# Altium PCB PSU_main.PcbDoc
Units mm, origin at the board's own origin, x right, y up, seen from the top; angles counter-clockwise.
Board outline 79.38 x 98.86 mm, 2 copper layers (Top Layer, Bottom Layer); 37 components, 13 nets, 77 pads, 2 vias.
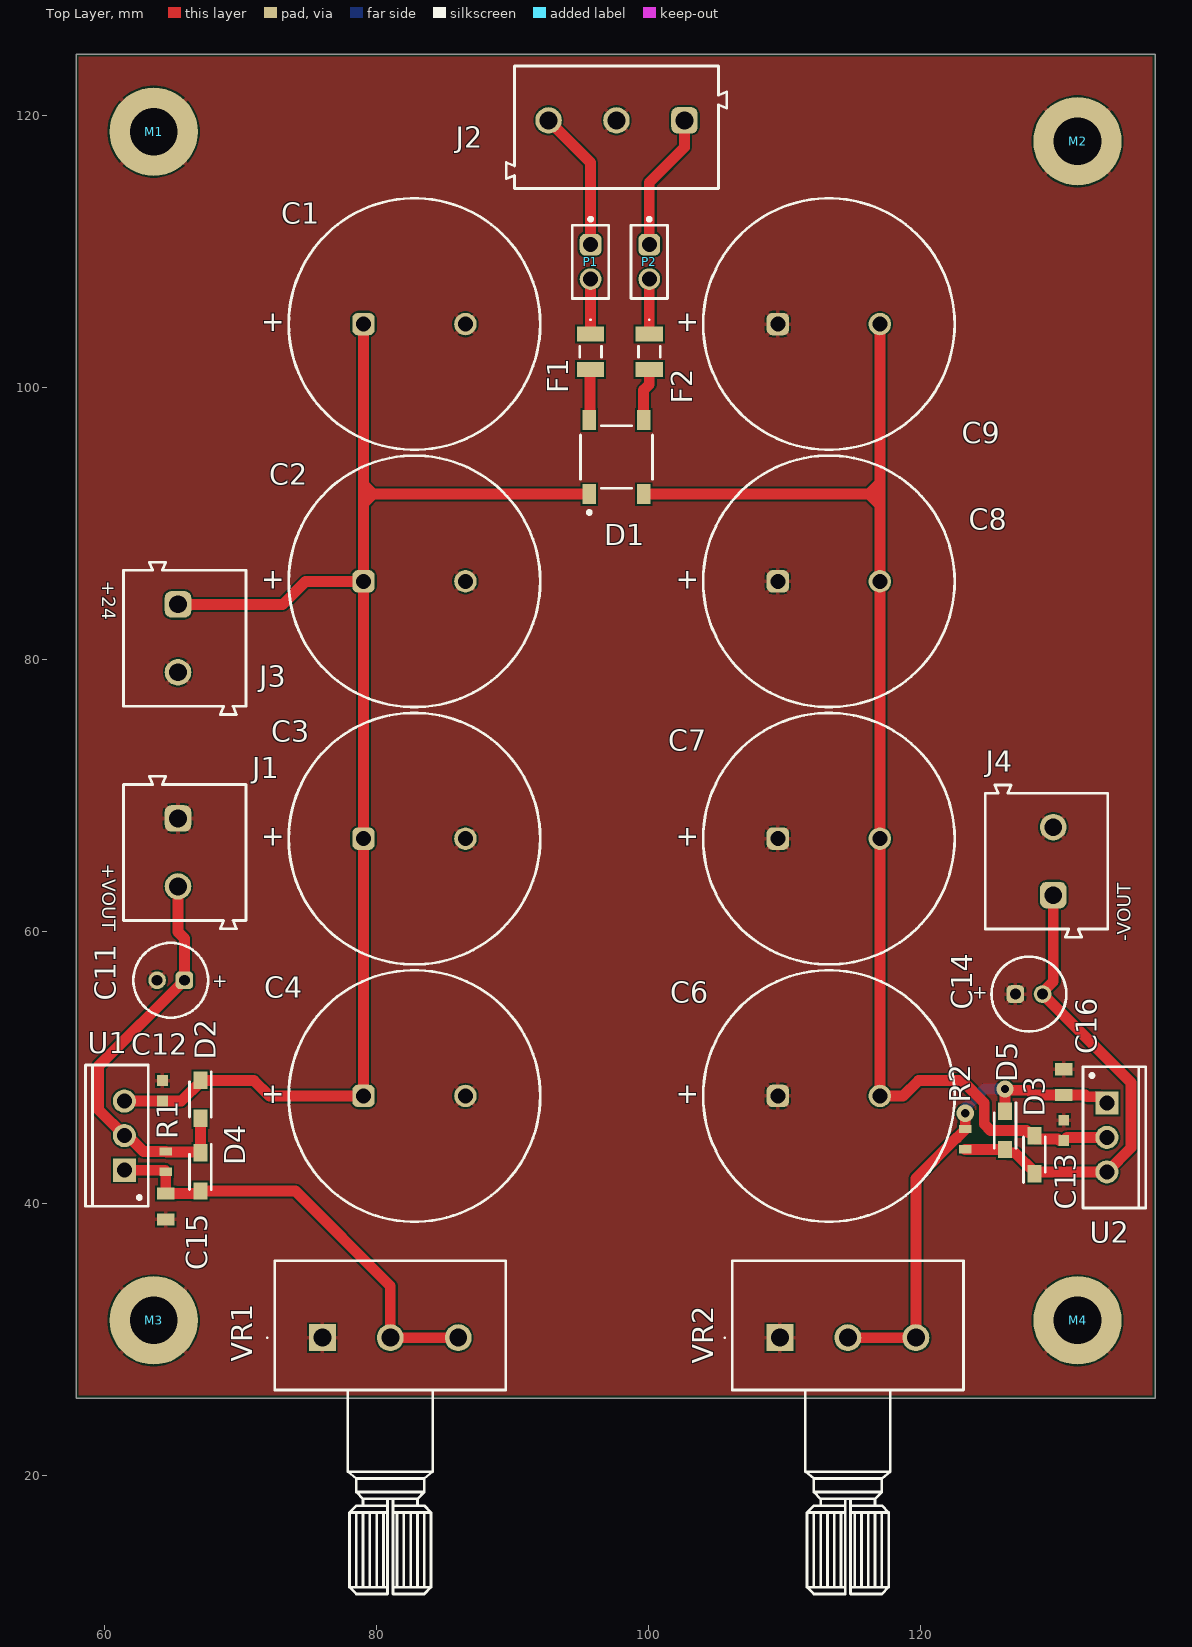
[diagram p0: Top Layer view]
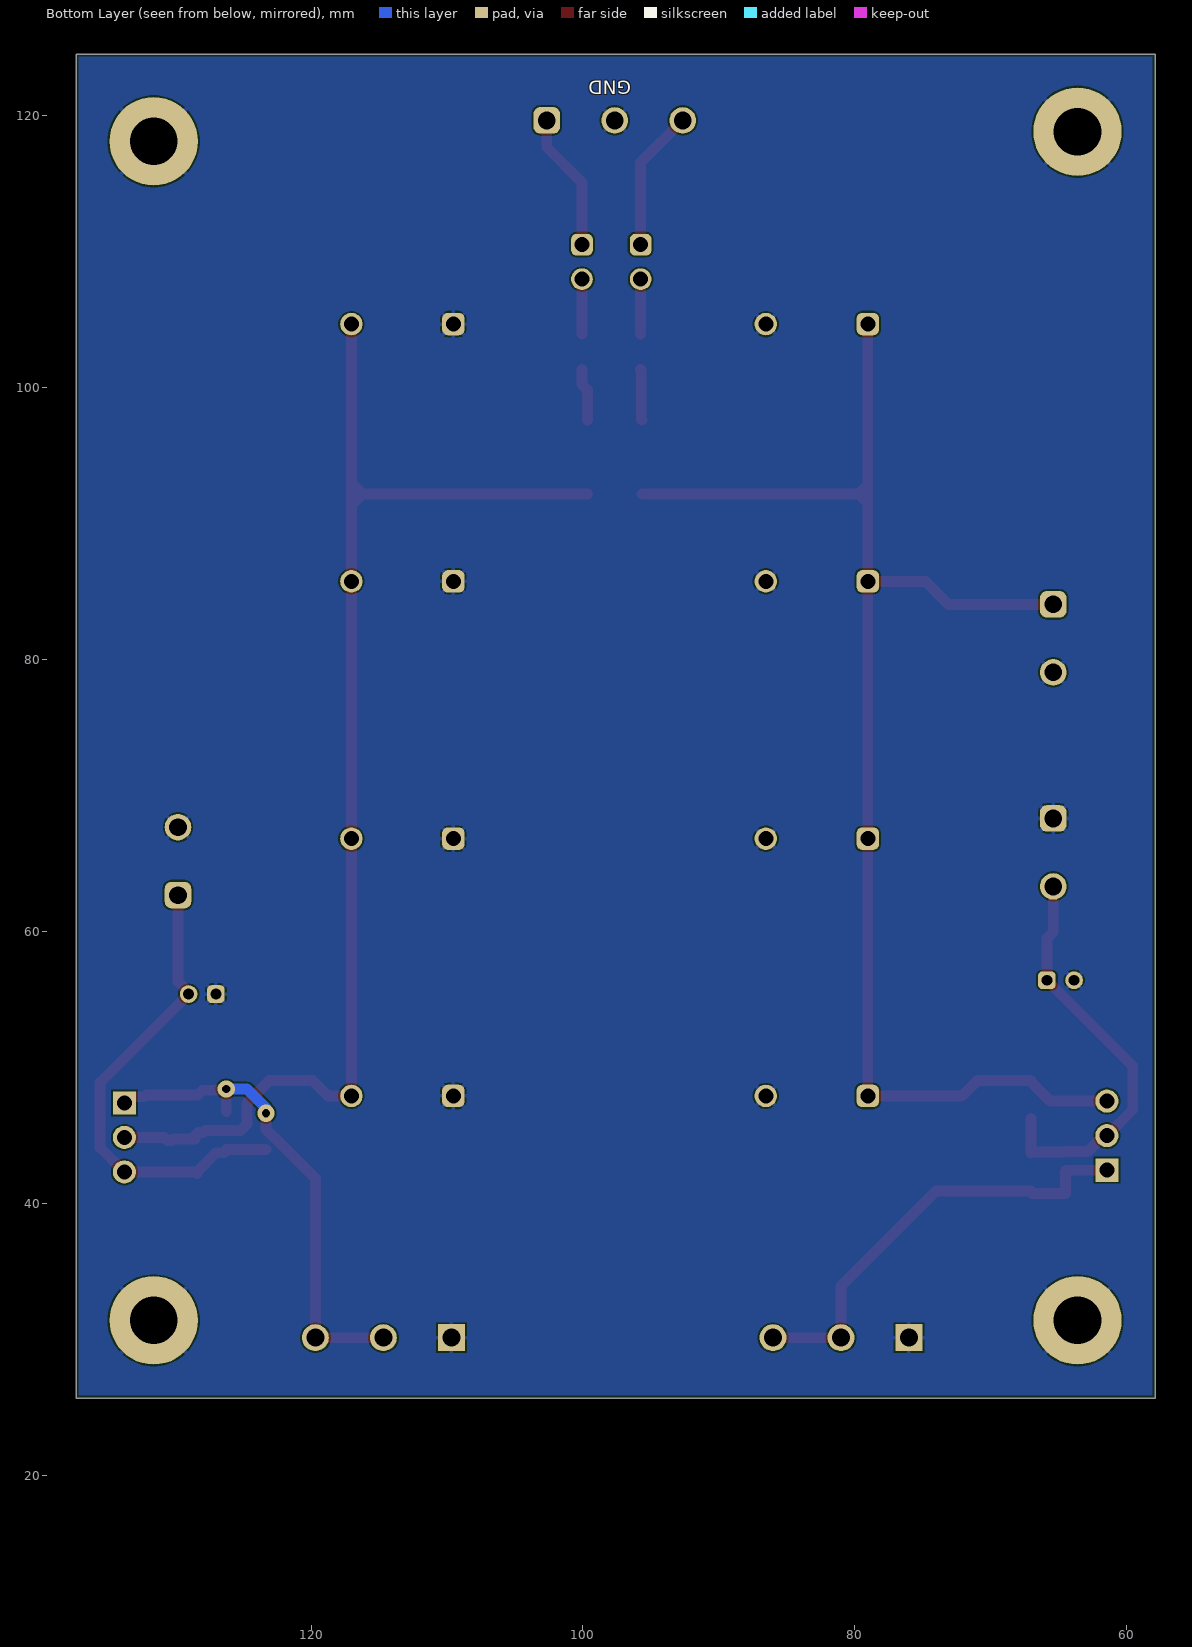
[diagram p1: Bottom Layer view, seen from below]
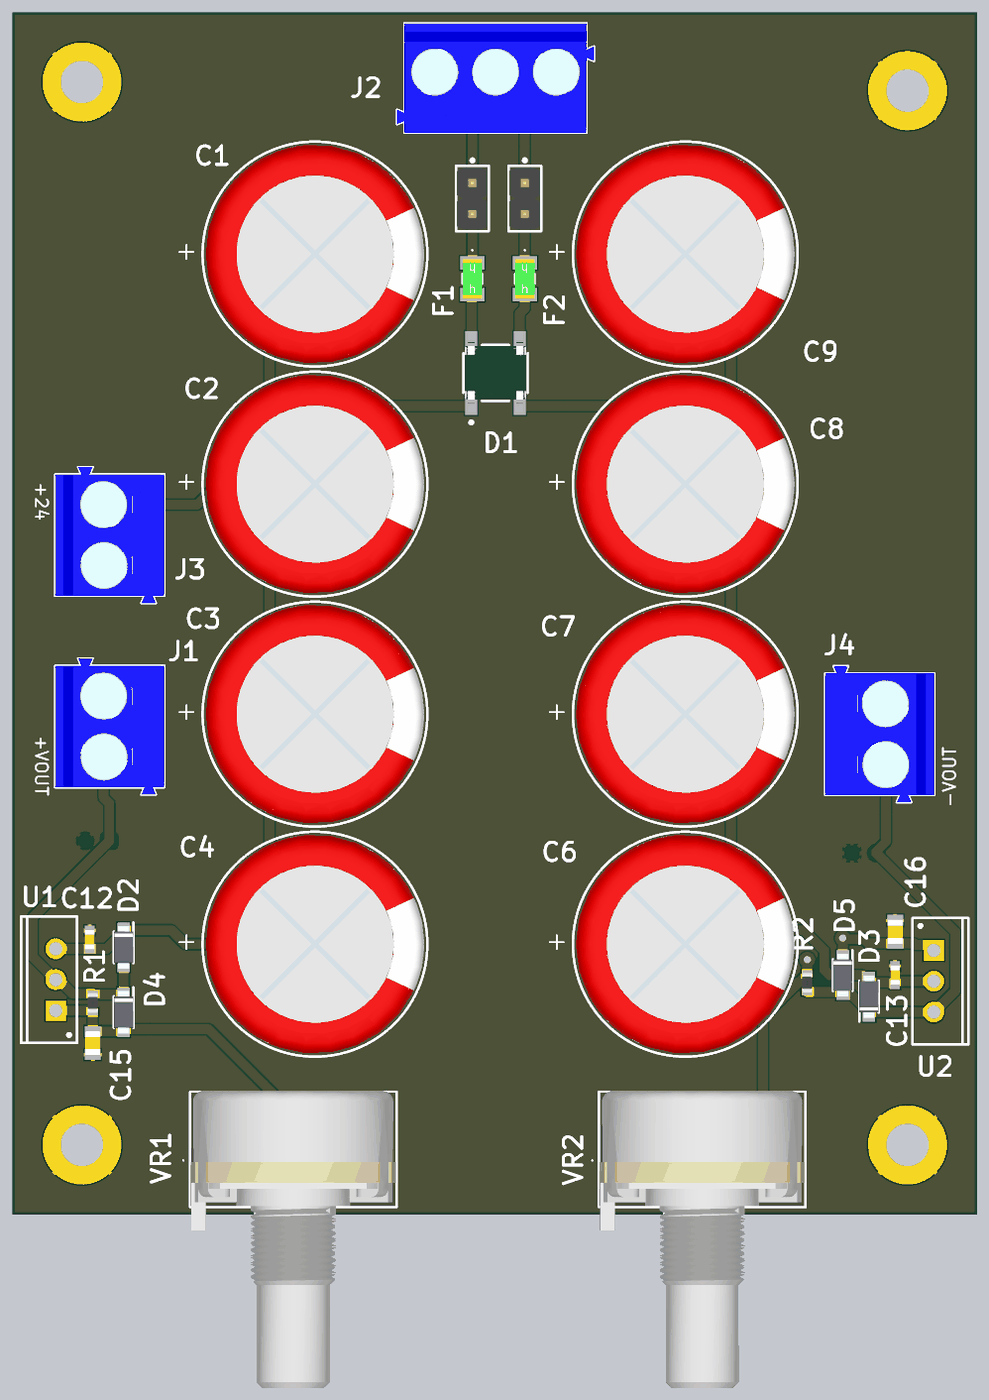
[diagram p2: 3D render of the assembled board from above, using the file's embedded part models]

## Layer stack, top to bottom
Top Solder: solder mask 0.0102, Solder Resist, Dk 3.5
Top Layer: signal copper 0.0356
Dielectric 1: dielectric 0.32, FR-4, Dk 4.8
Bottom Layer: signal copper 0.0356
Bottom Solder: solder mask 0.0102, Solder Resist, Dk 3.5

## Board outline
57.912,25.654 57.912,124.511 137.287,124.511 137.287,25.654

## Design rules (kind name [scope] priority, off if disabled: settings)
BoardOutlineClearance [All] p1: gap=0.2 ignorepadtopadclearanceinfootprint=FALSE
Clearance [All] p1: gap=0.127 ignorepadtopadclearanceinfootprint=FALSE except(0.2: Arc-Hole Track-Hole SMDPad-Hole THPad-Hole Via-Hole Fill-Hole Poly-Hole Region-Hole Text-Hole)
ComponentClearance [All] p1: gap=0.127 collisioncheckmode=3 verticalgap=0.127 showdistances=TRUE
DiffPairsRouting [All] p1: maxlimit=0.254 minlimit=0.127 mostfreqgap=0.127 toplayer_minwidth=0.127 toplayer_maxwidth=25.4 toplayer_prefwidth=0.127 bottomlayer_minwidth=0.127 bottomlayer_maxwidth=25.4 bottomlayer_prefwidth=0.127 maxuncoupledlength=12.7
Height [All] p1: minheight=0 maxheight=1816.048 prefheight=12.7
HoleSize [All] p1: absolutevalues=TRUE maxlimit=6.3 minlimit=0.15 maxpercent=80.000 minpercent=20.000
HoleToHoleClearance [All] p1: gap=0.25 allowstackedmicrovias=FALSE
MinimumAnnularRing [All] p1: minimumring=0.075
MinimumSolderMaskSliver [All] p1: minsoldermaskwidth=0
PlaneClearance [All] p1: clearance=0.127
PlaneConnect PlaneConnectPowerPads [InPadClass('PowerPads')] p1: planeconnectstyle=Direct reliefexpansion=0.508 reliefentries=4 reliefconductorwidth=0.254 reliefairgap=0.254
PlaneConnect [All] p2: pad.planeconnectstyle=Relief pad.reliefexpansion=0.3 pad.reliefentries=4 pad.reliefconductorwidth=0.127 pad.reliefairgap=0.127 via.planeconnectstyle=Direct via.reliefexpansion=0.3 via.reliefentries=4 via.reliefconductorwidth=0.127 via.reliefairgap=0.127
PolygonConnect PolygonConnectPowerPads [All vs (InPadClass('PowerPads'))] p1: connectstyle=Direct reliefconductorwidth=0.254 reliefentries=4 polygonreliefangle="90 Angle" airgapwidth=0.254
PolygonConnect [All] p2: thpad.connectstyle=Relief thpad.reliefconductorwidth=0.3 thpad.reliefentries=4 thpad.polygonreliefangle="90 Angle" thpad.airgapwidth=0.127 thpad.conductorbypadedge=TRUE thpad.mindistance=0.381 thpad.enablemindistance=FALSE smdpad.connectstyle=Relief smdpad.reliefconductorwidth=0.3 smdpad.reliefentries=4 smdpad.polygonreliefangle="90 Angle" smdpad.airgapwidth=0.127 smdpad.conductorbypadedge=TRUE smdpad.mindistance=0.381 smdpad.enablemindistance=FALSE via.connectstyle=Direct via.reliefconductorwidth=0.127 via.reliefentries=4 via.polygonreliefangle="90 Angle" via.airgapwidth=0.127
RoutingVias [All] p1: holewidth=0.3 width=0.6 viastyle="Through Hole" minholewidth=0.3 minwidth=0.6 maxholewidth=0.6 maxwidth=6.6
SilkToSilkClearance [All] p1: silktosilkclearance=0
SilkToSolderMaskClearance [IsPad] p1: minsilkscreentomaskgap=0.127 clearancetoexposedcopper=TRUE
SolderMaskExpansion SolderMaskExpansionVia [isVia] p1: expansion=0.102 istentingtop=TRUE
SolderMaskExpansion [All] p2: expansion=0.075 istentingtop=FALSE useseparateexpansions=TRUE expansionbottom=0.075 istentingbottom=FALSE
SupplyNets "Schematic Supply Nets_5" [InNet('+VOUT')] p1: voltage=0.000
SupplyNets "Schematic Supply Nets_3" [InNet('-VOUT')] p2: voltage=0.000
SupplyNets "Schematic Supply Nets_2" [InNet('-24V')] p3: voltage=0.000
SupplyNets "Schematic Supply Nets" [InNet('+24V')] p4: voltage=0.000
SupplyNets "Schematic Supply Nets_4" [InNet('GND')] p5: voltage=0.000
Width [All] p1: maxlimit=25.4 minlimit=0.127 preferedwidth=0.127 minimp=50.000000 maximp=50.000000 favimp=50.000000
20 further rules are at their usual default settings.

## Components (designator, comment, footprint, x,y, rotation, side; value= is the part's Value field where it differs from the comment)
C1 "860010581025" WCAP-ATG8_D18H35.5 82.804,104.648 r180 top
C2 "860010581025" WCAP-ATG8_D18H35.5 82.804,85.725 r180 top
C3 "860010581025" WCAP-ATG8_D18H35.5 82.804,66.802 r180 top
C4 "860010581025" WCAP-ATG8_D18H35.5 82.804,47.879 r180 top
C6 "860010581025" WCAP-ATG8_D18H35.5 113.284,47.879 r180 top
C7 "860010581025" WCAP-ATG8_D18H35.5 113.284,66.802 r180 top
C8 "860010581025" WCAP-ATG8_D18H35.5 113.284,85.725 r180 top
C9 "860010581025" WCAP-ATG8_D18H35.5 113.284,104.648 r180 top
C11 "860010672010" WCAP-ATG8_D5H11 1334.881,1326.388 r0 top
C12 "Capacitor 100nF 0603 50V" "Wurth 0603 capacitor" 64.262,48.26 r270 top value=100nF
C13 "Capacitor 100nF 0603 50V" "Wurth 0603 capacitor" 130.556,45.339 r270 top value=100nF
C14 "860010672010" WCAP-ATG8_D5H11 -1142,-1214.628 r180 top
C15 "Capacitor 10uF 0805 50V" "Wurth 0805 capacitor" 64.516,39.751 r90 top value=10uF
C16 "Capacitor 10uF 0805 50V" "Wurth 0805 capacitor" 130.556,48.895 r270 top value=10uF
D1 "ABS10A-13" FP-SOPA-4-MFG 97.663,94.869 r90 top
D2 "RF071MM2STFTR" "Rohm SOD-123" 67.056,47.625 r270 top
D3 "RF071MM2STFTR" "Rohm SOD-123" 128.397,43.561 r90 top
D4 "RF071MM2STFTR" "Rohm SOD-123" 67.056,42.291 r270 top
D5 "RF071MM2STFTR" "Rohm SOD-123" 126.238,45.339 r270 top
F1 "3413.0219.22" 3413021922 95.758,102.616 r270 top
F2 "3413.0219.22" 3413021922 100.076,102.616 r270 top
J1 "691101710002" "Wurth 2 pin 5mm screw terminal" 65.913,65.786 r270 top
J2 "691101710003" "Wurth 3 pin 5mm screw terminal" 97.663,119.126 r180 top
J3 "691101710002" "Wurth 2 pin 5mm screw terminal" 65.913,81.534 r270 top
J4 "691101710002" "Wurth 2 pin 5mm screw terminal" 129.286,65.151 r90 top
M1 "Mounting hole" "M3 hole"#1 64.643,118.797 r0 top
M2 "Mounting hole" "M3 hole"#2 131.572,118.797 r0 top
M3 "Mounting hole" "M3 hole"#3 63.627,31.369 r0 top
M4 "Mounting hole" "M3 hole"#4 131.572,31.242 r0 top
P1 "61300211121" "2x1 2.54mm M" 95.758,109.22 r270 top
P2 "61300211121" "2x1 2.54mm M" 100.076,109.22 r270 top
R1 "Resistor 120R 0603" "Wurth 0603 Resistor" 64.516,43.053 r90 top value=120R
R2 "Resistor 120R 0603" "Wurth 0603 Resistor" 123.317,44.704 r270 top value=120R
U1 "LM317T" TO-220 61.468,44.958 r90 top
U2 "LM337SP" TO220 133.731,44.831 r270 top
VR1 "2k" PDB181K215P503B 76.026,30.099 r0 top
VR2 "2k" PDB181K215P503B 109.681,30.099 r0 top

## Footprints (in the part's own frame and the unit in brackets; to place one, negate y for a bottom-side part, rotate by r counter-clockwise, add the part's x,y. Pads: shape width x height; smd on the part's side, far side on the other; paste and mask are expansions set on the pad)
"2x1 2.54mm M" [mm] "Pin Header, pitch 2.54 mm, THT, Vertical, single row, 2p"
  rrect50% 1.6x1.6 hole 1.1: 1(-1.27,0)
  round 1.6 hole 1.1: 2(1.27,0)
  silkscreen extent -3.26,-1.35 2.69,1.35, body extent -2.54,-1.27 2.54,1.27, height 8.57
3413021922 [mm]
  rect 1.1x2 smd: 1(-1.3,0) 2(1.3,0)
  silkscreen extent -2.4,-0.8 0.4,0.8, body extent -1.61,-0.8 1.61,0.8, height 0.64
FP-SOPA-4-MFG [mm]
  rect 1.45x1 smd paste+0 mask+0: 1(-2.725,2) 2(2.725,2) 3(-2.725,-2) 4(2.725,-2)
  silkscreen extent -4.2,-2.65 2.3,2.65, body extent -3.55,-2.75 3.55,2.75, height 0.25
"M3 hole"#1 [mm]
  round 6.5 hole 3.5: 1(-1.016,0)
"M3 hole"#2 [mm]
  round 6.5 hole 3.5: 1(0,-0.71)
"M3 hole"#3 [mm]
  round 6.5 hole 3.5: 1(0,0)
"M3 hole"#4 [mm]
  round 6.5 hole 3.5: 1(0,0.127)
PDB181K215P503B [mm]
  rect 1.98x1.98 hole 1.32: 1(0,0)
  round 1.98 hole 1.32: 2(5,0) 3(10,0)
  silkscreen extent -4.1,-18.85 13.5,5.65, body extent -3.51,-18.75 13.49,5.75, height 22.17
"Rohm SOD-123" [mm]
  rect 1.28x1.04 smd: 1(-1.4,0) 2(1.4,0)
  silkscreen extent -2.04,-0.8 1.3,0.8, body extent -1.75,-0.8 1.75,0.8, height 0.9
TO220 [mm] "TO, Thru-Hole, Vertical, Heatsink Mounted; 3 In-Line Leads; Pitch 2.54 mm"
  rect 1.7x1.7 hole 1.1: 1(-2.54,0)
  round 1.7 hole 1.1: 2(0,0) 3(2.54,0)
  silkscreen extent -5.2,-1.75 5.2,2.85, body extent -5.25,-1.8 5.25,2.9, height 19.7
TO-220 [mm] "TO, Thru-Hole, Vertical, Heatsink Mounted; 3 In-Line Leads; Pitch 2.54 mm"
  rect 1.7x1.7 hole 1.1: 1(-2.54,0)
  round 1.7 hole 1.1: 2(0,0) 3(2.54,0)
  silkscreen extent -5.2,-1.75 5.2,2.85, body extent -5.25,-1.8 5.25,2.9, height 19.7
WCAP-ATG8_D5H11 [mm] "Aluminum Electrolytic Capacitors, 5x11mm"
  rrect50% 1.3x1.3 hole 0.8: 1(-1269,-1270)
  round 1.3 hole 0.8: 2(-1271,-1270)
  silkscreen extent -1272.75,-1272.75 -1267.25,-1267.25, body extent -1272.49,-1272.5 -1267.5,-1267.5, height 11.31
WCAP-ATG8_D18H35.5 [mm] "Aluminum Electrolytic Capacitors, 18x35.5mm"
  rrect50% 1.65x1.65 hole 1.1: 1(3.75,0)
  round 1.65 hole 1.1: 2(-3.75,0)
  silkscreen extent -9.25,-9.25 9.25,9.25, body extent -8.99,-9 9,9, height 35.81
"Wurth 2 pin 5mm screw terminal" [mm] "5,00mm - modular - blue - Horizontal entry with pressure clamp - 12,6mm height - 02p"
  rrect50% 1.95x1.95 hole 1.3: 1(-2.5,-0.5)
  round 1.95 hole 1.3: 2(2.5,-0.5)
  silkscreen extent -5.6,-4.5 5.6,4.5, body extent -5.6,-4.5 5.6,4.5, height 12.65
"Wurth 3 pin 5mm screw terminal" [mm] "5,00mm - modular - blue - Horizontal entry with pressure clamp - 12,6mm height - 03p"
  rrect50% 1.95x1.95 hole 1.3: 1(-5,-0.5)
  round 1.95 hole 1.3: 2(0,-0.5) 3(5,-0.5)
  silkscreen extent -8.1,-4.5 8.1,4.5, body extent -8.1,-4.5 8.1,4.5, height 12.65
"Wurth 0603 capacitor" [mm] "Ceramic Capacitors, body 1.6x0.8mm"
  rect 0.8x0.8 smd: 1(-0.75,0) 2(0.75,0)
  body extent -0.8,-0.4 0.8,0.4, height 0.8
"Wurth 0603 Resistor" [mm] "Fixed Thick Film, body 1.60 x 0.80 mm"
  rect 0.6x0.9 smd paste-0.028 mask+0.1: 1(-0.75,0) 2(0.75,0)
  body extent -0.8,-0.4 0.8,0.4, height 0.45
"Wurth 0805 capacitor" [mm] "Ceramic Capacitors, body 2x1.25mm"
  rect 0.9x1.3 smd: 1(-0.95,0) 2(0.95,0)
  body extent -1,-0.63 1,0.63, height 1.25

## Part data
C1 C2 C3 C4 C6 C7 C8 C9: library part CMP-03913-54007253-2, "WCAP-ATG8 Aluminum Electrolytic Capacitors", Capacitance=4.7mF, Case/Package=Radial, Leakage Current=1.645mA, Manufacturer Lifecycle Status=ACTIVE, Max Operating Temperature=85°C, Min Operating Temperature=-40°C, Ripple Current=2.86A, Tolerance=20%, Voltage Rating=35V, Diameter=18mm, Height=35.5mm, Height - Seated (Max)=37.4904mm, Lead Pitch=7.493mm, Length=35.5mm, Life (Hours)=2000hours, Lifecycle Status=Production, Mount="Through Hole", Packaging="Tape & Box (TB)", Pitch=7.5mm, Polarity=Polar, REACH SVHC=Unknown, RoHS=Compliant, Voltage Rating (DC)=35V, YEOL="1 = Estimated lifetime > 10 years"
C11 C14: library part CMP-03913-53914128-2, "WCAP-ATG8 Aluminum Electrolytic Capacitors", Capacitance=22µF, Case/Package=Radial, Leakage Current=11µA, Max Operating Temperature=85°C, Min Operating Temperature=-40°C, Ripple Current=110mA, Tolerance=20%, Voltage Rating=50V, Diameter=5mm, Dissipation Factor=10%, Height=12.5mm, Height - Seated (Max)=12.4968mm, Lead Pitch=2.0066mm, Length=11mm, Life (Hours)=2000hours, Material=Aluminium, Mount="Through Hole", Packaging="Tape & Box (TB)", Pitch=2mm, Polarity=Polar, REACH SVHC=Unknown, RoHS=Compliant, Voltage Rating (DC)=50V
D1: library part CMP-12791-000054-1, "BRIDGE RECT 1PHASE 1KV 1A 4SOPA", Average Rectified Current=1A, Case/Package=SMD/SMT, Max Operating Temperature=150°C, Min Operating Temperature=-55°C, Mount="Surface Mount", Packaging="Cut Tape"
D2 D3 D4 D5: library part "Diode RF071MM2STFTR"
F1 F2: "Fuse", Manufacturer_Name=SCHURTER, Mouser Part Number=693-3413.0219.22, Datasheet Link=https://www.schurter.com/en/datasheet/typ_USI_1206.pdf, Height=0.6mm, Manufacturer_Part_Number=3413.0219.22, Mouser Price/Stock=https://www.mouser.com/Search/Refine.aspx?Keyword=693-3413.0219.22
J1 J3 J4: library part "2 pin 5mm screw terminal", "WR-TBL Series 101 Horizontal Entry Modular, THT, pitch 5mm, 02p", Manufacturer="Wurth Elektronik", Operating Temperature Max=105degC, Operating Temperature Min=-40degC, Rated Current=16A, Working Voltage="250V (AC)", Application="Pressure Clamp", ComponentLink1Description="Website Link", ComponentLink1URL=https://www.we-online.com, ComponentLink2Description="Datasheet Link", ComponentLink2URL=https://www.we-online.com/components/products/datasheet/691101710002, Lead Pitch=5mm, Manufacturer Part Number=691101710002, Modularity=Yes, Mount="Through Hole", Number of Pins=2, Number of Rows=1, Orientation=Horizontal, Packaging=Box, Product Series=WR-TBL, Wire Section="26 to 14 (AWG) 0.5 to 2.5 (mm^2)"
J2: library part "3 pin 5mm screw terminal", "WR-TBL Series 101 Horizontal Entry Modular, THT, pitch 5mm, 03p", Manufacturer="Wurth Elektronik", Operating Temperature Max=105degC, Operating Temperature Min=-40degC, Rated Current=16A, Working Voltage="250V (AC)", Application="Pressure Clamp", ComponentLink1Description="Website Link", ComponentLink1URL=https://www.we-online.com, ComponentLink2Description="Datasheet Link", ComponentLink2URL=https://www.we-online.com/components/products/datasheet/691101710003, Lead Pitch=5mm, Manufacturer Part Number=691101710003, Modularity=Yes, Mount="Through Hole", Number of Pins=3, Number of Rows=1, Orientation=Horizontal, Packaging=Box, Product Series=WR-TBL, Wire Section="26 to 14 (AWG) 0.5 to 2.5 (mm^2)"
P1 P2: library part 2P, "WR-PHD Pin Header, THT, Vertical, pitch 2.54mm, 1 Row, 2P", Contact Resistance=20mOhm, Manufacturer="Wurth Elektronik", Operating Temperature Max=105°C, Operating Temperature Min=-40°C, Rated Current=3A, Withstanding Voltage=500V, Working Voltage=250V, Category="Board-to-Board Connectors", ComponentLink1Description="Website Link", ComponentLink1URL=https://www.we-online.com/redexpert/article/61300211121?ad, ComponentLink2Description="Datasheet Link", ComponentLink2URL=https://www.we-online.com/redexpert/spec/61300211121?ad, Gender="Pin Header", Manufacturer Part Number=61300211121, Match Code=WR-PHD, Mount="Through Hole", Number of Pins=2, Number of Rows=1, Orientation=Vertical, Packaging=Bag, Pitch=2.54mm
U1: library part CMP-0244-00444-1, "1.5A, 1.2V to 37V Adjustable Voltage Regulator, 3-Pin TO-220", ComponentLink1Description="Manufacturer URL", ComponentLink1URL=http://www.st.com, ComponentLink2Description=Datasheet, ComponentLink2URL=http://www.st.com/internet/com/TECHNICAL_RESOURCES/TECHNICAL_LITERATURE/DATASHEET/CD00000455.pdf, ComponentLink3Description="Package Specification", ComponentLink3URL=http://www.st.com/internet/com/TECHNICAL_RESOURCES/TECHNICAL_LITERATURE/PACKAGE_INFORMATION/CD00004649.pdf, DatasheetVersion=1/11/2011, PackageDescription="TO, Thru-Hole, Vertical, Heatsink Mounted; 3 In-Line Leads; Pitch 2.54 mm", PackageReference=TO-220, PackageVersion=2011
U2: library part CMP-0244-00420-1, "Three-Terminal Negative Voltage Regulator, 3-Pin TO-220", ComponentLink1Description="Manufacturer URL", ComponentLink1URL=http://www.st.com, ComponentLink2Description=Datasheet, ComponentLink2URL=http://www.st.com/internet/com/TECHNICAL_RESOURCES/TECHNICAL_LITERATURE/DATASHEET/CD00000468.pdf, ComponentLink3Description="Package Specification", ComponentLink3URL=http://www.st.com/internet/com/TECHNICAL_RESOURCES/TECHNICAL_LITERATURE/PACKAGE_INFORMATION/CD00004649.pdf, DatasheetVersion=1/10/2011, PackageDescription="TO, Thru-Hole, Vertical, Heatsink Mounted; 3 In-Line Leads; Pitch 2.54 mm", PackageReference=TO220, PackageVersion=ver3.0
VR1 VR2: library part PDB181-K215P-503B, "Variable Resistor", Manufacturer_Name=Bourns, Mouser Part Number=652-PDB181K215P503B, Datasheet Link=https://www.digikey.in/en/products/detail/bourns-inc/PDB181-K215P-503B/4699117, Height=21mm, Manufacturer_Part_Number=PDB181-K215P-503B, Mouser Price/Stock=https://www.mouser.co.uk/ProductDetail/Bourns/PDB181-K215P-503B?qs=Zq5ylnUbLm4zTjfFsN3naw%3D%3D

## Via types
v1: diameter 1.27, hole 0.6, Top Layer to Bottom Layer, tented both sides, 2 vias

## Nets (pads, with @x,y where several pads share a name; then routed paths per layer and width w, separated by ;. In a path a pad name is that pad's centre, name@x,y a point inside that pad or via, vN(x,y) a via of type N, cw(c..) or ccw(c..) an arc to the next point about the centre after c; other vN are vias at no path point)
+24V: C1.1 C2.1 C3.1 C4.1 C12.2 D1.1 D2.1 J3.1 U1.3 | length 108.5
  Top Layer w0.8: U1.3 64.25,47.498 C12.2 64.274,47.498 65.649,47.498 67.056,48.905 D2.1 70.99,49.025 72.136,47.879 C4.1 C3.1 C2.1 ; J3.1 73.112,84.034 74.803,85.725 C2.1 ; C1.1 79.054,92.837 ; D1.1 79.747,92.144 ; C2.1 79.054,91.451 ; 79.054,91.451 79.054,92.202 ; 79.054,91.451 79.747,92.144 ; 79.054,92.202 79.054,92.837 ; 79.054,92.202 79.112,92.144 79.747,92.144 ; 79.054,92.837 79.747,92.144
+VOUT: C11.1 D2.2 D4.1 J1.2 R1.2 U1.2 | length 30.5
  Top Layer w0.8: J1.2 65.413,59.936 65.881,59.468 C11.1 59.563,50.07 59.563,46.863 U1.2 61.711,44.958 62.866,43.803 R1.2 64.516,43.797 64.566,43.747 D4.1@67,43.747 ; D4.1 D4.1@67,43.747 ; D2.2 67.056,43.803 D4.1@67,43.747
-24V: C6.2 C7.2 C8.2 C9.2 C13.2 D1.3 D3.2 U2.2 | length 96.6
  Top Layer w0.8: D1.3 116.214,92.144 ; C9.2 117.034,92.964 ; U2.2 130.798,44.831 C13.2 130.249,44.589 130.117,44.721 128.517,44.721 128.517,44.961 128.277,45.201 127.946,45.201 127.808,45.339 125.183,45.339 124.714,45.808 124.714,47.371 123.063,49.022 119.888,49.022 118.745,47.879 C6.2 C7.2 C8.2 117.034,91.44 ; 116.214,92.144 116.918,91.44 117.034,91.44 ; 116.214,92.144 116.976,92.144 117.034,92.202 ; 116.214,92.144 117.034,92.964 ; 117.034,91.44 117.034,92.202 ; 117.034,92.202 117.034,92.964
-VOUT: C14.2 D3.1 D5.2 J4.1 R2.2 U2.3 | length 35.5
  Top Layer w0.8: R2.2 123.332,43.939 D5.2 126.238,43.819 126.358,43.699 126.979,43.699 128.397,42.281 D3.1@128.397,42.171 ; D3.1 D3.1@128.397,42.171 ; J4.1 129.786,56.293 129,55.507 C14.2 135.509,48.863 135.509,44.069 U2.3 128.517,42.291 D3.1@128.397,42.171
GND: C1.2 C2.2 C3.2 C4.2 C6.1 C7.1 C8.1 C9.1 C11.2 C12.1 C13.1 C14.1 C15.1 C16.1 J1.1 J2.2 J3.2 J4.2 M1.1 M2.1 M3.1 M4.1 VR1.1 VR2.1
NetC15_2: C15.2 D4.2 R1.1 U1.1 VR1.2 VR1.3 | length 33.1
  Top Layer w0.8: U1.1 64.451,42.418 64.516,42.353 R1.1 C15.2 66.936,40.701 67.056,40.821 D4.2 74.044,40.891 81.026,33.909 VR1.2 VR1.3
NetC16_2: C16.2 D5.1 R2.1 U2.1 VR2.2 VR2.3 | length 36.1
  Top Layer w0.8: VR2.2 VR2.3 119.681,36.75 119.681,41.813 122.649,44.781 122.694,44.781 123.317,45.404 R2.1 v1(123.317,46.609) ; D5.1 v1(126.238,48.387) 126.328,48.297 127.979,48.297 128.331,47.945 C16.2 132.141,47.945 132.265,47.821 133.281,47.821 U2.1
  Bottom Layer w0.8: v1@123.317,46.99 124.714,48.387 v1(126.238,48.387)
NetD1_2: D1.2 F1.2 | length 3.8
  Top Layer w0.8: D1.2 95.71,97.642 95.71,101.268 F1.2
NetD1_4: D1.4 F2.2 | length 3.9
  Top Layer w0.8: D1.4 99.663,99.79 100.076,100.203 F2.2
NetF1_1: F1.1 P1.2 | length 4
  Top Layer w0.8: F1.1 P1.2
NetF2_1: F2.1 P2.2 | length 4
  Top Layer w0.8: F2.1 P2.2
NetJ2_1: J2.1 P2.1 | length 10.2
  Top Layer w0.8: P2.1 100.076,115.062 102.663,117.649 J2.1
NetJ2_3: J2.3 P1.1 | length 10.4
  Top Layer w0.8: J2.3 95.758,116.531 P1.1

## Polygon pours and split planes (outlines as drawn)
GND on Top Layer "NONET_L-01_P-001" (solid, pour order 1): 57.912,124.511 57.912,24.511 137.287,24.511 137.287,124.511
GND on Bottom Layer "NONET_L-01_P-001" (solid, pour order 0): 57.912,124.511 57.912,24.511 137.287,24.511 137.287,124.511

## Silkscreen, mask and mechanical layers (free items; w line width, h text height)
Top Overlay:
  text "+24" at 59.825,85.788 h1 r270
  text "+VOUT" at 59.825,64.944 h1 r270
  text "-VOUT" at 135.501,59.262 h1 r90
Bottom Overlay:
  text "GND" at 96.457,122.547 h1 r180
Mechanical 1:
  the board outline again, w0.1

## Text inside footprints (layer, text, board x,y; h text height)
C1: Top Overlay "+" at 73.254,105.398 h1.5 r180
C2: Top Overlay "+" at 73.254,86.475 h1.5 r180
C3: Top Overlay "+" at 73.254,67.552 h1.5 r180
C4: Top Overlay "+" at 73.254,48.629 h1.5 r180
C6: Top Overlay "+" at 103.734,48.629 h1.5 r180
C7: Top Overlay "+" at 103.734,67.552 h1.5 r180
C8: Top Overlay "+" at 103.734,86.475 h1.5 r180
C9: Top Overlay "+" at 103.734,105.398 h1.5 r180
C11: Top Overlay "+" at 67.931,55.888 h1
C14: Top Overlay "+" at 124.95,55.872 h1 r180